# Altium PCB esp32‑smart‑greenhouse.pcbdoc
Units mil, origin at the board's own origin, x right, y up, seen from the top; angles counter-clockwise.
Board outline 3937.01 x 3740.16 mil, 2 copper layers (Top Layer, Bottom Layer); 31 components, 31 nets, 167 pads, 8 vias.
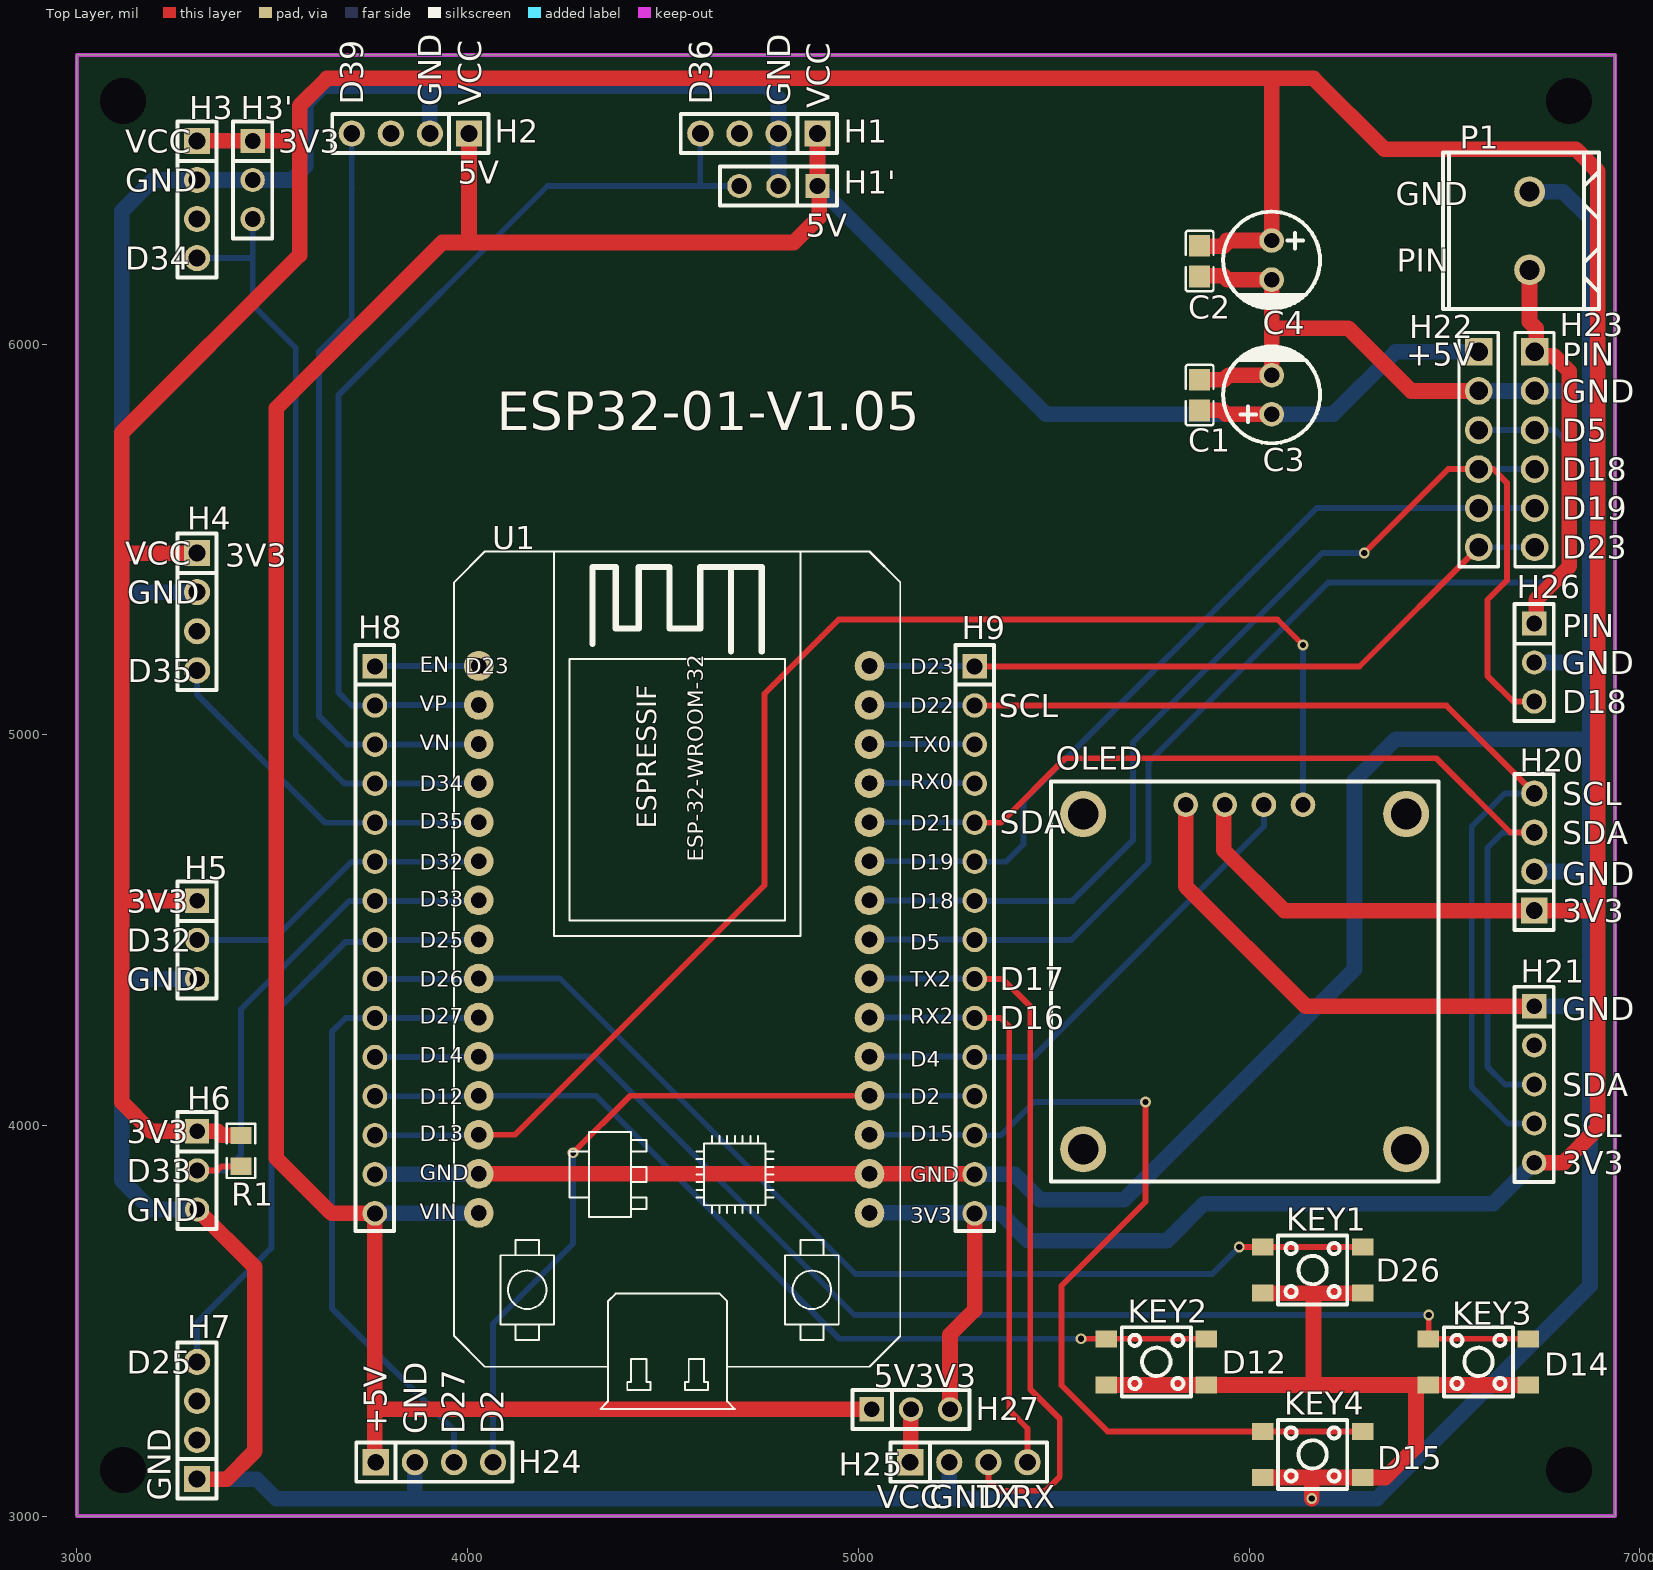
[diagram p0: Top Layer view]
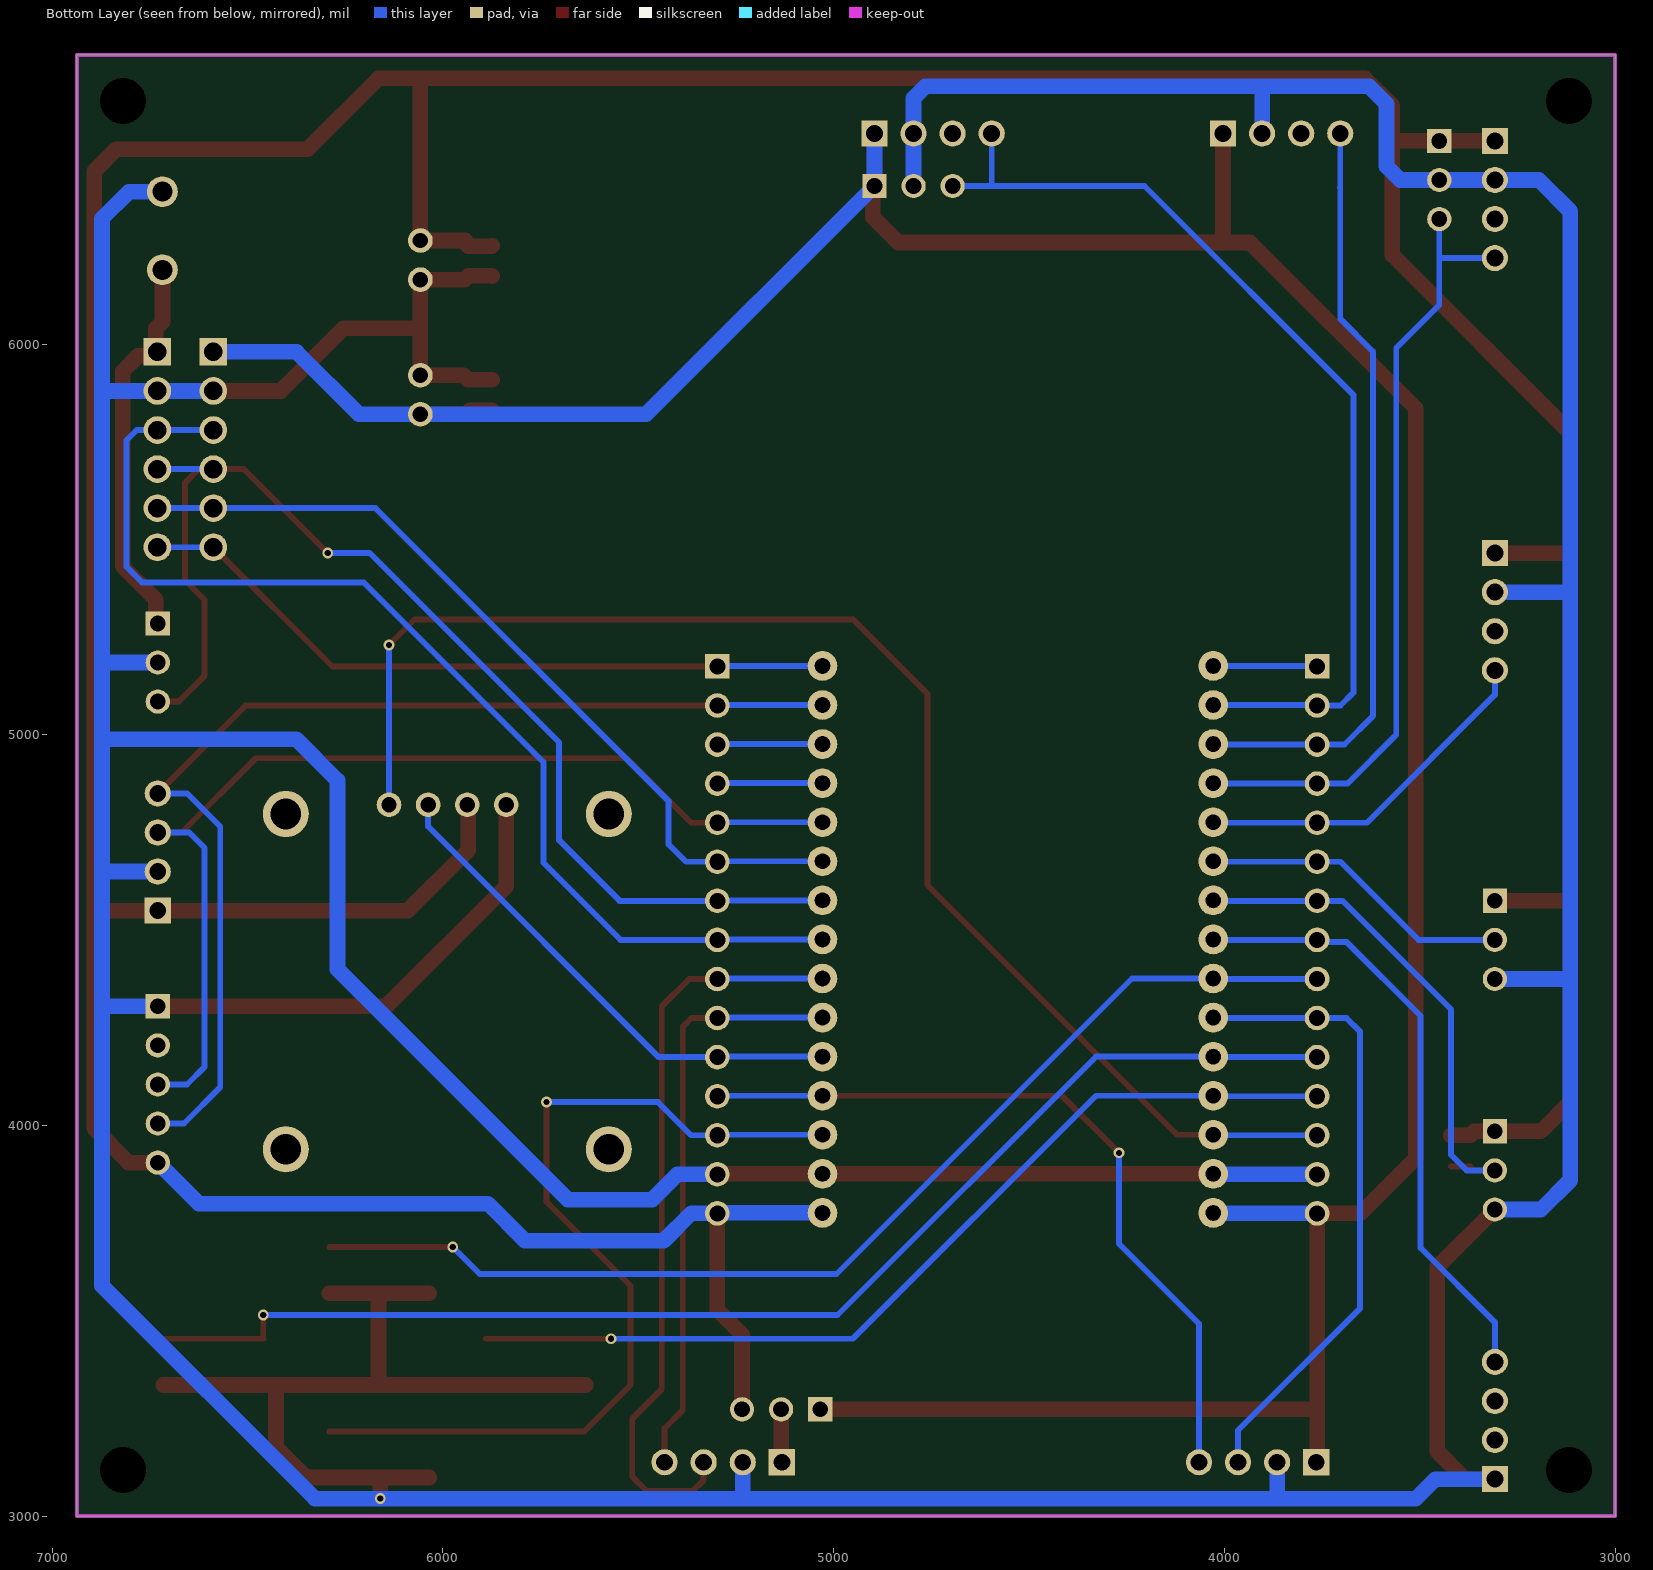
[diagram p1: Bottom Layer view, seen from below]

## Layer stack, top to bottom
Top Layer: signal copper (thickness not stored)
Dielectric: dielectric 12.6, FR-4, Dk 4.8
Bottom Layer: signal copper (thickness not stored)

## Board outline
3000,6740.16 6937.01,6740.16 6937.01,3000 3000,3000

## Design rules (kind name [scope] priority, off if disabled: settings)
BoardOutlineClearance copperThickness1oz [All] p0: genericclearance=10 ignorepadtopadclearanceinfootprint=FALSE except(0: Arc-SplitContinuation Track-SplitContinuation SMDPad-SplitContinuation THPad-SplitContinuation Via-SplitContinuation Fill-SplitContinuation Poly-SplitContinuation Region-SplitContinuation Text-SplitContinuation; 6: SMDPad-CutoutEdge THPad-CutoutEdge Via-CutoutEdge Fill-CutoutEdge Region-CutoutEdge; 11.8: Track-OutlineEdge SMDPad-OutlineEdge THPad-OutlineEdge Via-OutlineEdge Fill-OutlineEdge Region-OutlineEdge Poly-OutlineEdge Text-OutlineEdge Track-CutoutEdge)
BoardOutlineClearance copperThickness2oz [All] p0: genericclearance=10 ignorepadtopadclearanceinfootprint=FALSE except(0: Arc-SplitContinuation Track-SplitContinuation SMDPad-SplitContinuation THPad-SplitContinuation Via-SplitContinuation Fill-SplitContinuation Poly-SplitContinuation Region-SplitContinuation Text-SplitContinuation; 6: SMDPad-CutoutEdge THPad-CutoutEdge Via-CutoutEdge Fill-CutoutEdge Region-CutoutEdge; 11.8: Track-OutlineEdge SMDPad-OutlineEdge THPad-OutlineEdge Via-OutlineEdge Fill-OutlineEdge Region-OutlineEdge Poly-OutlineEdge Text-OutlineEdge Track-CutoutEdge)
Clearance copperThickness1oz [(InNet('+5V') OR InNet('GND') OR InNet('3.3V') OR InNet('D15') OR InNet('D2') OR InNet('D4') OR InNet('RX2') OR InNet('TX2') OR InNet('D5') OR InNet('D18') OR InNet('D19') OR InNet('D21') OR InNet('$1N1952') OR InNet('$1N1955') OR InNet('D22') OR InNet('D23') OR InNet('D13') OR InNet('D12') OR InNet('D14') OR InNet('D27') OR InNet('D26') OR InNet('D25') OR InNet('D33') OR InNet('D32') OR InNet('D35') OR InNet('D34') OR InNet('D39') OR InNet('D36') OR InNet('$1N2002') OR InNet('$1N5337') OR InNet('VCC5'))] p1: gap=7 ignorepadtopadclearanceinfootprint=FALSE except(4: Track-Track; 6: Track-SMDPad SMDPad-SMDPad Track-THPad SMDPad-THPad THPad-THPad Track-Via SMDPad-Via THPad-Via Via-Via Track-Fill SMDPad-Fill THPad-Fill Via-Fill Fill-Fill SMDPad-Region THPad-Region Via-Region Fill-Region Region-Region Track-Poly SMDPad-Poly THPad-Poly Via-Poly Fill-Poly Poly-Poly Track-Text SMDPad-Text THPad-Text Via-Text Fill-Text Region-Text Poly-Text Text-Text Track-Hole SMDPad-Hole THPad-Hole Via-Hole Fill-Hole Region-Hole Poly-Hole Text-Hole; 11.8: Track-Region Region-Poly Track-Sheet SMDPad-Sheet THPad-Sheet Via-Sheet Fill-Sheet Region-Sheet Poly-Sheet Text-Sheet Sheet-Hole)
Clearance copperThickness2oz [All] p1: gap=7 ignorepadtopadclearanceinfootprint=FALSE except(6: Track-SMDPad SMDPad-SMDPad Track-THPad SMDPad-THPad THPad-THPad Track-Via SMDPad-Via THPad-Via Via-Via Track-Fill SMDPad-Fill THPad-Fill Via-Fill Fill-Fill SMDPad-Region THPad-Region Via-Region Fill-Region Region-Region Track-Poly SMDPad-Poly THPad-Poly Via-Poly Fill-Poly Poly-Poly Track-Text SMDPad-Text THPad-Text Via-Text Fill-Text Region-Text Poly-Text Text-Text Track-Hole SMDPad-Hole THPad-Hole Via-Hole Fill-Hole Region-Hole Poly-Hole Text-Hole; 8: Track-Track; 11.8: Track-Region Region-Poly Track-Sheet SMDPad-Sheet THPad-Sheet Via-Sheet Fill-Sheet Region-Sheet Poly-Sheet Text-Sheet Sheet-Hole)
DiffPairsRouting differentialPair [All] p1: maxuncoupledlength=10 minlimit=6 maxlimit=6 mostfreqgap=6 toplayer_minwidth=5 toplayer_prefwidth=10 toplayer_maxwidth=100 bottomlayer_minwidth=5 bottomlayer_prefwidth=10 bottomlayer_maxwidth=100
PasteMaskExpansion pasteMaskExpansion [All] p1: expansion=0
PlaneConnect innerPlane [All] p1: planeconnectstyle=Relief reliefexpansion=20 reliefentries=4 reliefconductorwidth=10 reliefairgap=10
PolygonConnect copperRegion [All] p1: connectstyle=Relief reliefentries=4 reliefconductorwidth=10 polygonreliefangle="90 Angle" airgapwidth=10
RoutingVias viaSize [All] p1: viastyle="Through Hole" holewidth=12.0078 minholewidth=11.811 maxholewidth=248.0314 width=24.0158 minwidth=19.685 maxwidth=393.7008
SolderMaskExpansion solderMaskExpansion [All] p1: useseparateexpansions=TRUE expansion=2 expansionbottom=2
Width copperThickness1oz [All] p1: maxlimit=100 minlimit=5 preferedwidth=10
Width copperThickness2oz [All] p1: maxlimit=100 minlimit=8 preferedwidth=10

## Components (designator, comment, footprint, x,y, rotation, side; value= is the part's Value field where it differs from the comment)
C1 "0805B104K500NT" C0805 5873.56,5869.59 r270 top
C2 "0805B104K500NT" C0805 5873.56,6212.56 r90 top
C3 "KM227M025E11RR0VH2FP0" CAP-TH_BD6.3-P2.50-D1.0-FD 6057.77,5870.21 r90 top
C4 "KM227M025E11RR0VH2FP0" CAP-TH_BD6.3-P2.50-D1.0-FD 6057.77,6215 r270 top
H1 "22102041" HDR-TH_4P-P2.54-V-M 4745.59,6539.08 r180 top
H1' "2135-103SG0CUNT2" HDR-TH_3P-P2.54-V-F 4795.59,6404.68 r180 top locked
H2 "22102041" HDR-TH_4P-P2.54-V-M 3853.49,6539.08 r180 top
H3 "22102041" HDR-TH_4P-P2.54-V-M 3307.77,6370 r270 top
H3' "2135-103SG0CUNT2" HDR-TH_3P-P2.54-V-F 3450,6420 r270 top
H4 "22102041" HDR-TH_4P-P2.54-V-M 3307.77,5315 r270 top
H5 "2135-103SG0CUNT2" HDR-TH_3P-P2.54-V-F 3307.77,4475 r270 top
H6 "2135-103SG0CUNT2" HDR-TH_3P-P2.54-V-F 3307.77,3885 r270 top
H7 "22102041" HDR-TH_4P-P2.54-V-M 3307.77,3245 r90 top
H8 "PZ254-1-15-Z-8.5_C2894938" HDR-TH_15P-P2.54-V-M 3762.78,4475 r270 top
H9 "PZ254-1-15-Z-8.5_C2894938" HDR-TH_15P-P2.54-V-M 5297.77,4475 r270 top
H20 "22102041" HDR-TH_4P-P2.54-V-M 6730,4700 r90 top
H21 "2185-105SSNAYNT2" HDR-TH_5P-P2.54-V-F 6730,4105 r270 top
H22 "2.54-1x6P直针" HDR-TH_6P-P2.54-V-M-1 6587.77,5730 r270 top
H23 "2.54-1x6P直针" HDR-TH_6P-P2.54-V-M-1 6731,5730 r270 top
H24 "22102041" HDR-TH_4P-P2.54-V-M 3915,3138.15 r0 top
H25 "22102041" HDR-TH_4P-P2.54-V-M 5282.79,3138.15 r0 top
H26 "2135-103SG0CUNT2" HDR-TH_3P-P2.54-V-F 6730,5185 r270 top
H27 "2135-103SG0CUNT2" HDR-TH_3P-P2.54-V-F 5134.69,3273.47 r0 top
KEY1 "TS-1091S-A2B2-C1D2" SW-SMD_4P-L4.5-W4.5-P3.00-LS6.8 6162.77,3630 r0 top
KEY2 "TS-1091S-A2B2-C1D2" SW-SMD_4P-L4.5-W4.5-P3.00-LS6.8 5762.77,3395 r0 top
KEY3 "TS-1091S-A2B2-C1D2" SW-SMD_4P-L4.5-W4.5-P3.00-LS6.8 6587.26,3395 r0 top
KEY4 "TS-1091S-A2B2-C1D2" SW-SMD_4P-L4.5-W4.5-P3.00-LS6.8 6162.77,3158.15 r0 top
OLED "0.96OLED_4P_MODULE_JX" "0.96 OLED IIC" 5492.79,4880 r0 top locked
P1 "WJ500V-5.08-2P" CONN-TH_2P-P5.00_WJ500V-5.08-2P 6717.97,6290 r90 top
R1 "0805W8F1002T5E_C17414" R0805 3420,3935 r90 top
U1 "ESP32" esp32-devkit 3962.77,5460 r0 top

## Footprints (in the part's own frame and the unit in brackets; to place one, negate y for a bottom-side part, rotate by r counter-clockwise, add the part's x,y. Pads: shape width x height; smd on the part's side, far side on the other; paste and mask are expansions set on the pad)
"0.96 OLED IIC" [mm]
  round 1.6 hole 1: 1(8.77,-1.5) 2(11.31,-1.5) 3(13.85,-1.5) 4(16.39,-1.5)
  round 3 hole 2: 5(2.1,-23.9) 5(2.1,-2.1) 5(23.1,-23.9) 5(23.1,-2.1)
  silkscreen extent 0,-26 25.2,0
C0805 [mm]
  rect 1.41x1.35 smd: 1(-1,0) 2(1,0)
  silkscreen extent -1.96,-0.9 1.96,0.9
CAP-TH_BD6.3-P2.50-D1.0-FD [mm]
  round 1.6 hole 1: 1(-1.27,0) 2(1.27,0)
  silkscreen extent -3.15,-3.15 3.17,3.15
CONN-TH_2P-P5.00_WJ500V-5.08-2P [mm]
  round 2 hole 1.3: 1(-2.54,0) 2(2.54,0)
  silkscreen extent -5.08,-4.52 5.08,5.64
esp32-devkit [mil]
  round 76 hole 39.36: 1(1065.88,-1683.79) 2(1065.88,-1583.79) 3(1065.88,-1483.79) 4(1065.88,-1383.79) 5(1065.88,-1283.79) 6(1065.88,-1183.79) 7(1065.88,-1083.79) 8(1065.88,-983.79) 9(1065.88,-883.79) 10(1065.88,-783.79) 11(1065.88,-683.79) 12(1065.88,-583.79) 13(1065.88,-483.79) 14(1065.88,-383.79) 15(1065.88,-283.79) 16(65.88,-283.79) 17(65.88,-383.79) 18(65.88,-483.79) 19(65.88,-583.79) 20(65.88,-683.79) 21(65.88,-783.79) 22(65.88,-883.79) 23(65.88,-983.79) 24(65.88,-1083.79) 25(65.88,-1183.79) 26(65.88,-1283.79) 27(65.88,-1383.79) 28(65.88,-1483.79) 29(65.88,-1583.79) 30(65.88,-1683.79)
  silkscreen extent 3,-2186 1145,9
HDR-TH_3P-P2.54-V-F [mil]
  rect 62x62 hole 40.16: 1(-100,0)
  round 62 hole 40.16: 2(0,0) 3(100,0)
  silkscreen extent -150,-50 150,50
HDR-TH_4P-P2.54-V-M [mm]
  rect 1.7x1.7 hole 1.1: 1(-3.81,0)
  round 1.7 hole 1.1: 2(-1.27,0) 3(1.27,0) 4(3.81,0)
  silkscreen extent -5.08,-1.27 5.08,1.27
HDR-TH_5P-P2.54-V-F [mil]
  rect 62x62 hole 40.16: 1(-200,0)
  round 62 hole 40.16: 2(-100,0) 3(0,0) 4(100,0) 5(200,0)
  silkscreen extent -250,-50 250,50
HDR-TH_6P-P2.54-V-M-1 [mm]
  rect 1.8x1.8 hole 1.2: 1(-6.35,0)
  round 1.8 hole 1.2: 2(-3.81,0) 3(-1.27,0) 4(1.27,0) 5(3.81,0) 6(6.35,0)
  silkscreen extent -7.62,-1.27 7.62,1.27
HDR-TH_15P-P2.54-V-M [mm]
  rect 1.6x1.6 hole 1.05: 1(-17.78,0)
  round 1.6 hole 1.05: 2(-15.24,0) 3(-12.7,0) 4(-10.16,0) 5(-7.62,0) 6(-5.08,0) 7(-2.54,0) 8(0,0) 9(2.54,0) 10(5.08,0) 11(7.62,0) 12(10.16,0) 13(12.7,0) 14(15.24,0) 15(17.78,0)
  silkscreen extent -19.17,-1.25 18.93,1.25
R0805 [mm]
  rect 1.133x1.377 smd: 1(-1,0) 2(1,0)
  silkscreen extent -1.76,-0.92 1.76,0.92
SW-SMD_4P-L4.5-W4.5-P3.00-LS6.8 [mm]
  rect 1.4x1.1 smd: 1(-3.25,1.5) 2(3.25,1.5) 3(-3.25,-1.5) 4(3.25,-1.5)
  silkscreen extent -2.25,-2.25 2.25,2.25

## Free pads (board coordinates)
  round 39.37 hole 118.11: 31(3118.11,3118.11) 31(3118.11,6622.05) 31(6818.9,3118.11) 31(6818.9,6622.05)

## Via types
v1: diameter 27.56, hole 15.75, Top Layer to Bottom Layer, 8 vias

## Nets (pads, with @x,y where several pads share a name; then routed paths per layer and width w, separated by ;. In a path a pad name is that pad's centre, name@x,y a point inside that pad or via, vN(x,y) a via of type N, cw(c..) or ccw(c..) an arc to the next point about the centre after c; other vN are vias at no path point)
3.3V: C2.2 C4.1 H3'.1 H3.1 H4.1 H5.1 H6.1 H9.15 H20.1 H21.5 H27.3 OLED.2 R1.2 U1.1 | length 13926.6
  Top Layer w40: H5.1 3115.74,4575 3115,4575.74 ; H4.1 3118.38,5465 3115,5461.62 ; H3.1 H3'.1 3567.13,6520 3570,6522.87 ; R1.2 3419.37,3975 3370,3975 3360,3985 H6.1 3190,3985 3115,4060 3115,4575.74 ; H27.3 5234.69,3464.68 5297.77,3527.77 H9.15 ; C2.2 5875.49,6250 5935,6250 5950,6265 ; OLED.2 5935,4817.88 5935,4705 6090,4550 H20.1 6890.31,4550 6892.77,4552.46 ; 5942.77,6265 5950,6265 ; H21.5 6805,3905 6892.77,3992.77 6892.77,4552.46 ; 3115,4575.74 3115,5461.62 ; 3115,5461.62 3115,5772.93 3570,6227.93 3570,6522.87 ; 3570,6522.87 3570,6610 3640,6680 6050.32,6680 ; 5950,6265 C4.1 6057.77,6672.54 6050.32,6680 ; 6050.32,6680 6165,6680 6346.58,6498.42 6836.58,6498.42 6892.77,6442.23 6892.77,4552.46
  Bottom Layer w40: U1.1 5296.57,3776.21 H9.15 5365,3775 5435,3705 5790,3705 5885,3800 6625,3800 H21.5
$1N1952: H9.4 U1.12 | length 269.6
  Bottom Layer w15: U1.12 5296.57,4876.21 H9.4
$1N1955: H9.3 U1.13 | length 269.6
  Bottom Layer w15: U1.13 5296.57,4976.21 H9.3
$1N2002: H8.1 U1.16 | length 266.4
  Bottom Layer w15: H8.1 3763.98,5176.21 U1.16
$1N5337: H25.1 H27.2 | length 136.1
  Top Layer w40: H25.1 5134.69,3140.04 H27.2
+5V: C1.2 C3.1 H1'.1 H1.1 H2.1 H8.15 H22.1 H24.1 H27.1 U1.30 | length 8818.7
  Top Layer w40: H24.1 3762.78,3140.38 3762.78,3272.62 ; H2.1 4003.49,6263.17 4006.65,6260 ; H1.1 H1'.1 4900,6400.27 4900,6325 4835,6260 4006.65,6260 ; H27.1 3763.62,3273.47 3762.78,3272.62 ; C1.2 5930.99,5830.22 5941.21,5820 6057.56,5820 C3.1 ; 3762.78,3272.62 H8.15 3651.87,3775 3510,3916.87 3510,5835 3935,6260 4006.65,6260
  Bottom Layer w40: H8.15 4027.44,3775 U1.30 ; H1.1 H1'.1 5480.06,5820.21 C3.1 6215.21,5820.21 6375,5980 H22.1
D2: H9.12 H24.4 U1.4 | length 1965.6
  Top Layer w15: v1(4270,3930) 4416.21,4076.21 U1.4
  Bottom Layer w15: H24.4 4065,3492.59 4270,3697.59 v1(4270,3930) ; U1.4 5296.57,4076.21 H9.12
D4: H9.11 OLED.3 U1.5 | length 1310.1
  Bottom Layer w15: U1.5 5296.57,4176.21 H9.11 5447.77,4175 6038.07,4765.29 OLED.3
D5: H9.8 H22.3 H23.3 U1.8 | length 2885.1
  Bottom Layer w15: U1.8 5296.57,4476.21 H9.8 5545.27,4475 5742.77,4672.5 5742.77,4930 6202.77,5390 6770,5390 6810,5430 6810,5753.78 6783.78,5780 H23.3 H22.3
D12: H8.12 KEY2.1 KEY2.2 U1.27 | length 2386.2
  Top Layer w15: v1(5570,3454.05) KEY2.1 KEY2.2
  Bottom Layer w15: H8.12@3761.57,4073.79 H8.12 U1.27@4027.44,4075 ; U1.27 4328.79,4076.21 4950.94,3454.05 v1(5570,3454.05)
D13: H8.13 OLED.4 U1.28 | length 3643.4
  Top Layer w15: U1.28 4121.21,3976.21 4220,4075 4759.94,4614.94 4759.94,5104.94 4950,5295 6073.07,5295 v1(6138.07,5230)
  Bottom Layer w15: H8.13 U1.28@4027.44,3975 ; OLED.4 v1(6138.07,5230)
D14: H8.11 KEY3.1 KEY3.2 U1.26 | length 3288.7
  Top Layer w15: v1(6460,3515) 6460,3454.74 KEY3.1 KEY3.2
  Bottom Layer w15: H8.11@3761.57,4173.79 H8.11 U1.26@4027.44,4175 ; U1.26 4328.79,4176.21 4990,3515 v1(6460,3515)
D15: H9.13 KEY4.1 KEY4.2 U1.3 | length 2375.6
  Top Layer w15: v1(5735,4060) 5735,3805 5520,3590 5520,3335 5637.8,3217.2 KEY4.1 KEY4.2
  Bottom Layer w15: U1.3 5296.57,3976.21 H9.13 5365,3975 5450,4060 v1(5735,4060)
D18: H9.7 H22.4 H23.4 H26.3 U1.9 | length 3047.3
  Top Layer w15: v1(6295,5465) 6510,5680 H22.4 6625,5680 6660,5645 6660,5395 6610,5345 6610,5151.38 6676.38,5085 H26.3
  Bottom Layer w15: U1.9 5296.57,4576.21 H9.7 5547.77,4575 5702.77,4730 5702.77,4980 6187.77,5465 v1(6295,5465) ; H22.4 H23.4@6722.77,5680
D19: H9.6 H22.5 H23.5 U1.10 | length 2135.4
  Bottom Layer w15: U1.10 5296.57,4676.21 H9.6 5377.77,4675 5422.77,4720 5422.77,4826.55 5421.05,4828.27 6172.77,5580 H22.5 H23.5@6722.77,5580
D21: H9.5 H20.3 H21.3 U1.11 | length 2657.1
  Top Layer w15: H9.5 5365,4775 5530,4940 6479.4,4940 6669.4,4750 H20.3
  Bottom Layer w15: U1.11 5296.57,4776.21 H9.5 ; H20.3@6702.77,4750 6649.56,4750 6610,4710.44 6610,4150 6655,4105 H21.3
D22: H9.2 H20.4 H21.4 U1.14 | length 2828.6
  Top Layer w15: H9.2 6505,5075 H20.4
  Bottom Layer w15: U1.14 5296.57,5076.21 H9.2 ; H21.4@6702.77,4005 6662.93,4005 6570,4097.93 6570,4765 6655,4850 H20.4
D23: H9.1 H22.6 H23.6 U1.15 | length 1821
  Top Layer w15: H9.1 6282.77,5175 H22.6
  Bottom Layer w15: U1.15 5296.57,5176.21 H9.1 ; H22.6 H23.6@6722.77,5480
D25: H7.4 H8.8 U1.23 | length 1574.1
  Bottom Layer w15: H7.4 3307.77,3496.65 3497.77,3686.65 3497.77,4280 3687.77,4470 3757.78,4470 H8.8 U1.23@4027.44,4475
D26: H8.9 KEY1.1 KEY1.2 U1.24 | length 2870.3
  Top Layer w15: v1(5975,3689.05) KEY1.1 KEY1.2
  Bottom Layer w15: H8.9@3761.57,4373.79 H8.9 U1.24@4027.44,4375 ; U1.24 4236.36,4376.21 4992.57,3620 5905.94,3620 v1(5975,3689.05)
D27: H8.10 H24.3 U1.25 | length 1618.6
  Bottom Layer w15: H24.3@3965,3140 3965,3220 3652.6,3532.4 3652.6,4239.83 3687.77,4275 H8.10 U1.25@4027.44,4275
D32: H5.2 H8.6 U1.21 | length 802.5
  Bottom Layer w15: H5.2 3502.77,4475 3702.77,4675 H8.6 U1.21@4027.44,4675
D33: H6.2 H8.7 R1.1 U1.22 | length 1341.9
  Top Layer w15: H6.2 3360,3885 3370,3895 3419.37,3895 R1.1
  Bottom Layer w15: H6.2 3380,3885 3420,3925 3420,4297.23 3697.77,4575 H8.7 ; H8.7@3761.57,4573.79 H8.7 ; U1.22@4027.44,4575 H8.7
D34: H3'.3 H3.4 H8.4 U1.19 | length 2029.2
  Bottom Layer w15: H3.4 3448.74,6220 3450,6218.74 ; H3'.3 3450,6218.74 ; H8.4@3761.57,4873.79 H8.4 ; U1.19@4027.44,4875 H8.4 ; 3450,6218.74 3450,6100 3560,5990 3560,5000 3685,4875 H8.4
D35: H4.4 H8.5 U1.20 | length 919.7
  Bottom Layer w15: H4.4 3307.77,5102.23 3635,4775 H8.5 ; H8.5@3761.57,4773.79 H8.5 ; U1.20@4027.44,4775 H8.5
D36: H1'.3 H1.4 H8.2 U1.17 | length 2516.5
  Bottom Layer w15: U1.17 3763.98,5076.21 H8.2 3702.6,5075 3670,5107.6 3670,5870 4204.68,6404.68 H1'.3 ; 4595.59,6404.72 H1.4
D39: H2.4 H8.3 U1.18 | length 1962.6
  Bottom Layer w15: H2.4@3703.49,6535.93 3703.49,6400.52 ; 3703.89,6400.93 3703.49,6400.52 ; H8.3@3761.57,4973.79 H8.3 ; U1.18@4027.44,4975 H8.3 ; 3703.49,6400.52 3703.49,6064.45 3620,5980.96 3620,5047.77 3692.77,4975 H8.3
GND: C1.1 C2.1 C3.2 C4.2 H1'.2 H1.2 H2.2 H3'.2 H3.2 H4.2 H5.3 H6.3 H7.1 H8.14 H9.14 H20.2 H21.1 H22.2 H23.2 H24.2 H25.2 H26.2 KEY1.3 KEY1.4 KEY2.3 KEY2.4 KEY3.3 KEY3.4 KEY4.3 KEY4.4 OLED.1 P1.2 U1.2 U1.29 | length 22414.6
  Top Layer w40: H7.1 3383.96,3095 3455,3166.04 3455,3637.77 H6.3 ; U1.29 U1.2 5296.57,3876.21 H9.14 ; KEY2.3 KEY2.4 6172.41,3335.95 ; OLED.1 5838.07,4611.93 6145,4305 H21.1 ; C1.1 5936.73,5908.96 5947.99,5920.21 C3.2 6057.77,6040.75 ; C2.1 5875.37,6175 5935,6175 5945,6165 C4.2 6057.77,6040.75 ; KEY4.3 6160.63,3099.09 ; KEY1.3 6165.15,3570.95 ; v1(6160.63,3045) 6160.63,3099.09 ; KEY1.4 6165.15,3570.95 ; H22.2 6415,5880 6254.25,6040.75 6057.77,6040.75 ; KEY3.4 KEY3.3 6427.28,3335.95 ; 6160.63,3099.09 KEY4.4 6349.09,3099.09 6427.28,3177.28 6427.28,3335.95 ; 6165.15,3570.95 6165.15,3343.21 6172.41,3335.95 ; 6172.41,3335.95 6427.28,3335.95
  Bottom Layer w15: H8.14@3761.57,3873.79 H8.14
  Bottom Layer w40: H7.1 3460,3095 3510,3045 3861.86,3045 ; H6.3 3190,3785 3115,3860 3115,4375.16 ; H5.3 3115.16,4375 3115,4375.16 ; H4.2 3117.23,5365 3115,5367.23 ; H8.14 4027.44,3875 U1.29 ; H24.2 3865,3048.14 3861.86,3045 ; H2.2 3903.49,6657.12 3900.61,6660 ; H1'.2 H1.2 4795.59,6629.41 4765,6660 3900.61,6660 ; H25.2@5232.79,3139 5232.79,3045.86 5231.93,3045 ; H9.14 5400,3875 5465,3810 5680,3810 6270,4400 6270,4883.28 6375.71,4988.99 6872.77,4988.99 ; H22.2 H23.2 6872.09,5880 6872.77,5879.31 ; P1.2 6804,6390 6872.77,6321.22 6872.77,5879.31 ; H21.1 6868.66,4305 6872.77,4300.88 ; H20.2 6872.05,4650 6872.77,4650.72 ; H26.2 6871.69,5185 6872.77,5183.92 ; 3115,4375.16 3115,5367.23 ; 3115,5367.23 3115,6340 3195,6420 H3.2 H3'.2 3550,6420 3585,6455 3585,6615 3630,6660 3900.61,6660 ; 3861.86,3045 5231.93,3045 ; 5231.93,3045 v1(6160.63,3045) 6327.77,3045 6872.77,3590 6872.77,4300.88 ; 6872.77,4300.88 6872.77,4650.72 ; 6872.77,4650.72 6872.77,4988.99 ; 6872.77,4988.99 6872.77,5183.92 ; 6872.77,5183.92 6872.77,5879.31
RX2: H9.10 H25.4 U1.6 | length 1500.4
  Top Layer w15: H9.10 5364.01,4275 5386.32,4252.7 5386.32,3270.87 5432.79,3224.4 H25.4@5432.79,3139
  Bottom Layer w15: U1.6 5296.57,4276.21 H9.10
TX2: H9.9 H25.3 U1.7 | length 1930.9
  Top Layer w15: H9.9 5370,4375 5440,4305 5440,3325 5515.61,3249.39 5515.61,3101.29 5479.32,3065 5360,3065 5332.79,3092.21 H25.3
  Bottom Layer w15: U1.7 5296.57,4376.21 H9.9
VCC5: H23.1 H26.1 P1.1 | length 1010.7
  Top Layer w40: P1.1 6717.97,6057.03 6735,6040 6735,5984 H23.1 6741,5970 6780,5970 6820,5930 6820,5431 6735,5346 6735,5290 H26.1
pads on no net: H1.3 H2.3 H3.3 H4.3 H7.2 H7.3 H21.2 OLED.5

## Keep-outs
Board Outline Layer:
  the board outline again, w10

## Silkscreen, mask and mechanical layers (free items; w line width, h text height)
Top Silkscreen Layer:
  text "D39" at 3732.41,6612.1 h59.06 r90
  text "D36" at 4626.38,6612.1 h59.06 r90
  text "VCC" at 4035,6610 h59.06 r90
  text "GND" at 3932.41,6608.9 h59.06 r90
  text "GND" at 4826.38,6608.9 h59.06 r90
  text "VCC" at 4926.38,6604.1 h59.06 r90
  text "VCC" at 3123.97,6489.87 h59.06
  text "3V3" at 3515,6490 h59.06
  text "5V" at 3975,6410 h59.06
  text "GND" at 3123.97,6389.87 h59.06
  text "GND" at 6375,6355 h59.06
  text "5V" at 4865,6275 h59.06
  text "D34" at 3123.97,6189.87 h59.06
  text "PIN" at 6377.77,6185 h59.06
  text "+5V" at 6402.77,5945 h59.06
  text "PIN" at 6801.17,5945 h59.06
  text "GND" at 6801.17,5850 h59.06
  text "ESP32-01-V1.05" at 4075,5780 h98.43
  text "D5" at 6801.17,5750 h59.06
  text "D18" at 6801.17,5650 h59.06
  text "D19" at 6801.17,5550 h59.06
  text "D23" at 6801.17,5450 h59.06
  text "VCC" at 3123.97,5434.87 h59.06
  text "3V3" at 3380,5430 h59.06
  text "GND" at 3128.77,5334.87 h59.06
  text "PIN" at 6801.17,5250 h59.06
  text "GND" at 6800,5155 h59.06
  text "D35" at 3130.37,5134.87 h59.06
  text "D18" at 6801.17,5055 h59.06
  text "SCL" at 5360,5045 h59.06
  text "SCL" at 6801.17,4820 h59.06
  text "SDA" at 5361.57,4746.21 h59.06
  text "SDA" at 6801.17,4720 h59.06
  text "GND" at 6801.17,4615 h59.06
  text "3V3" at 3127.17,4544.87 h59.06
  text "3V3" at 6801.17,4520 h59.06
  text "D32" at 3127.17,4444.87 h59.06
  text "D17" at 5361.57,4346.21 h59.06
  text "GND" at 3127.17,4344.87 h59.06
  text "GND" at 6801.17,4270 h59.06
  text "D16" at 5361.57,4246.21 h59.06
  text "SDA" at 6801.17,4075 h59.06
  text "SCL" at 6801.17,3970 h59.06
  text "3V3" at 3127.17,3954.87 h59.06
  text "3V3" at 6801.17,3875 h59.06
  text "D33" at 3127.17,3854.87 h59.06
  text "GND" at 3127.17,3754.87 h59.06
  text "D26" at 6325,3600 h59.06
  text "D25" at 3127.17,3364.87 h59.06
  text "D12" at 5930,3365 h59.06
  text "D14" at 6755,3360 h59.06
  text "5V" at 5040,3330 h59.06
  text "3V3" at 5145,3330 h59.06
  text "+5V" at 3792.77,3210 h59.06 r90
  text "GND" at 3895,3210 h59.06 r90
  text "D27" at 3992.77,3210 h59.06 r90
  text "D2" at 4092.77,3210 h59.06 r90
  text "D15" at 6327.77,3120 h59.06
  text "GND" at 3240,3040 h59.06 r90
  text "VCC" at 5047.77,3020 h59.06
  text "GND" at 5182.77,3020 h59.06
  text "TX" at 5305,3020 h59.06
  text "RX" at 5392.77,3020 h59.06

## Text inside footprints (layer, text, board x,y; h text height)
U1: Mech6 "ESP32-DEVKITV1" at 4732.77,4720 h50 r90; Top Silkscreen Layer "3V3" at 5132.77,3750 h40; Top Silkscreen Layer "GND" at 5132.77,3855 h40; Top Silkscreen Layer "D15" at 5132.77,3960 h40; Top Silkscreen Layer "D2" at 5132.77,4055 h40; Top Silkscreen Layer "D4" at 5132.77,4150 h40; Top Silkscreen Layer "RX2" at 5132.77,4260 h40; Top Silkscreen Layer "TX2" at 5132.77,4355 h40; Top Silkscreen Layer "D5" at 5132.77,4450 h40; Top Silkscreen Layer "D18" at 5132.77,4555 h40; Top Silkscreen Layer "D19" at 5132.77,4655 h40; Top Silkscreen Layer "D21" at 5132.77,4755 h40; Top Silkscreen Layer "RX0" at 5132.77,4860 h40; Top Silkscreen Layer "TX0" at 5132.77,4955 h40; Top Silkscreen Layer "D22" at 5132.77,5055 h40; Top Silkscreen Layer "D23" at 3994.2,5156.21 h40; Top Silkscreen Layer "VIN" at 3877.77,3760 h40; Top Silkscreen Layer "GND" at 3877.77,3860 h40; Top Silkscreen Layer "D13" at 3877.77,3960 h40; Top Silkscreen Layer "D12" at 3877.77,4055 h40; Top Silkscreen Layer "D14" at 3877.77,4160 h40; Top Silkscreen Layer "D27" at 3877.77,4260 h40; Top Silkscreen Layer "D26" at 3877.77,4355 h40; Top Silkscreen Layer "D25" at 3877.77,4455 h40; Top Silkscreen Layer "D33" at 3877.77,4560 h40; Top Silkscreen Layer "D32" at 3877.77,4655 h40; Top Silkscreen Layer "D35" at 3877.77,4760 h40; Top Silkscreen Layer "D34" at 3877.77,4855 h40; Top Silkscreen Layer "VN" at 3877.77,4960 h40; Top Silkscreen Layer "VP" at 3877.77,5060 h40; Top Silkscreen Layer "EN" at 3877.77,5160 h40; Top Silkscreen Layer "ESPRESSIF" at 4482.77,4760 h50 r90; Top Silkscreen Layer "ESP-32-WROOM-32" at 4602.77,4675 h40 r90; Top Silkscreen Layer "D23" at 5132.77,5155 h40